# Altium PCB Audio_Meter_V4.5.PcbDoc (part 4 of 5)
Units mil, origin at the board's own origin, x right, y up, seen from the top; angles counter-clockwise.
Board outline 2756.14 x 2519.69 mil, 2 copper layers (Top Layer, Bottom Layer), stack 57.087 mil thick; 109 components, 62 nets, 315 pads, 566 vias.
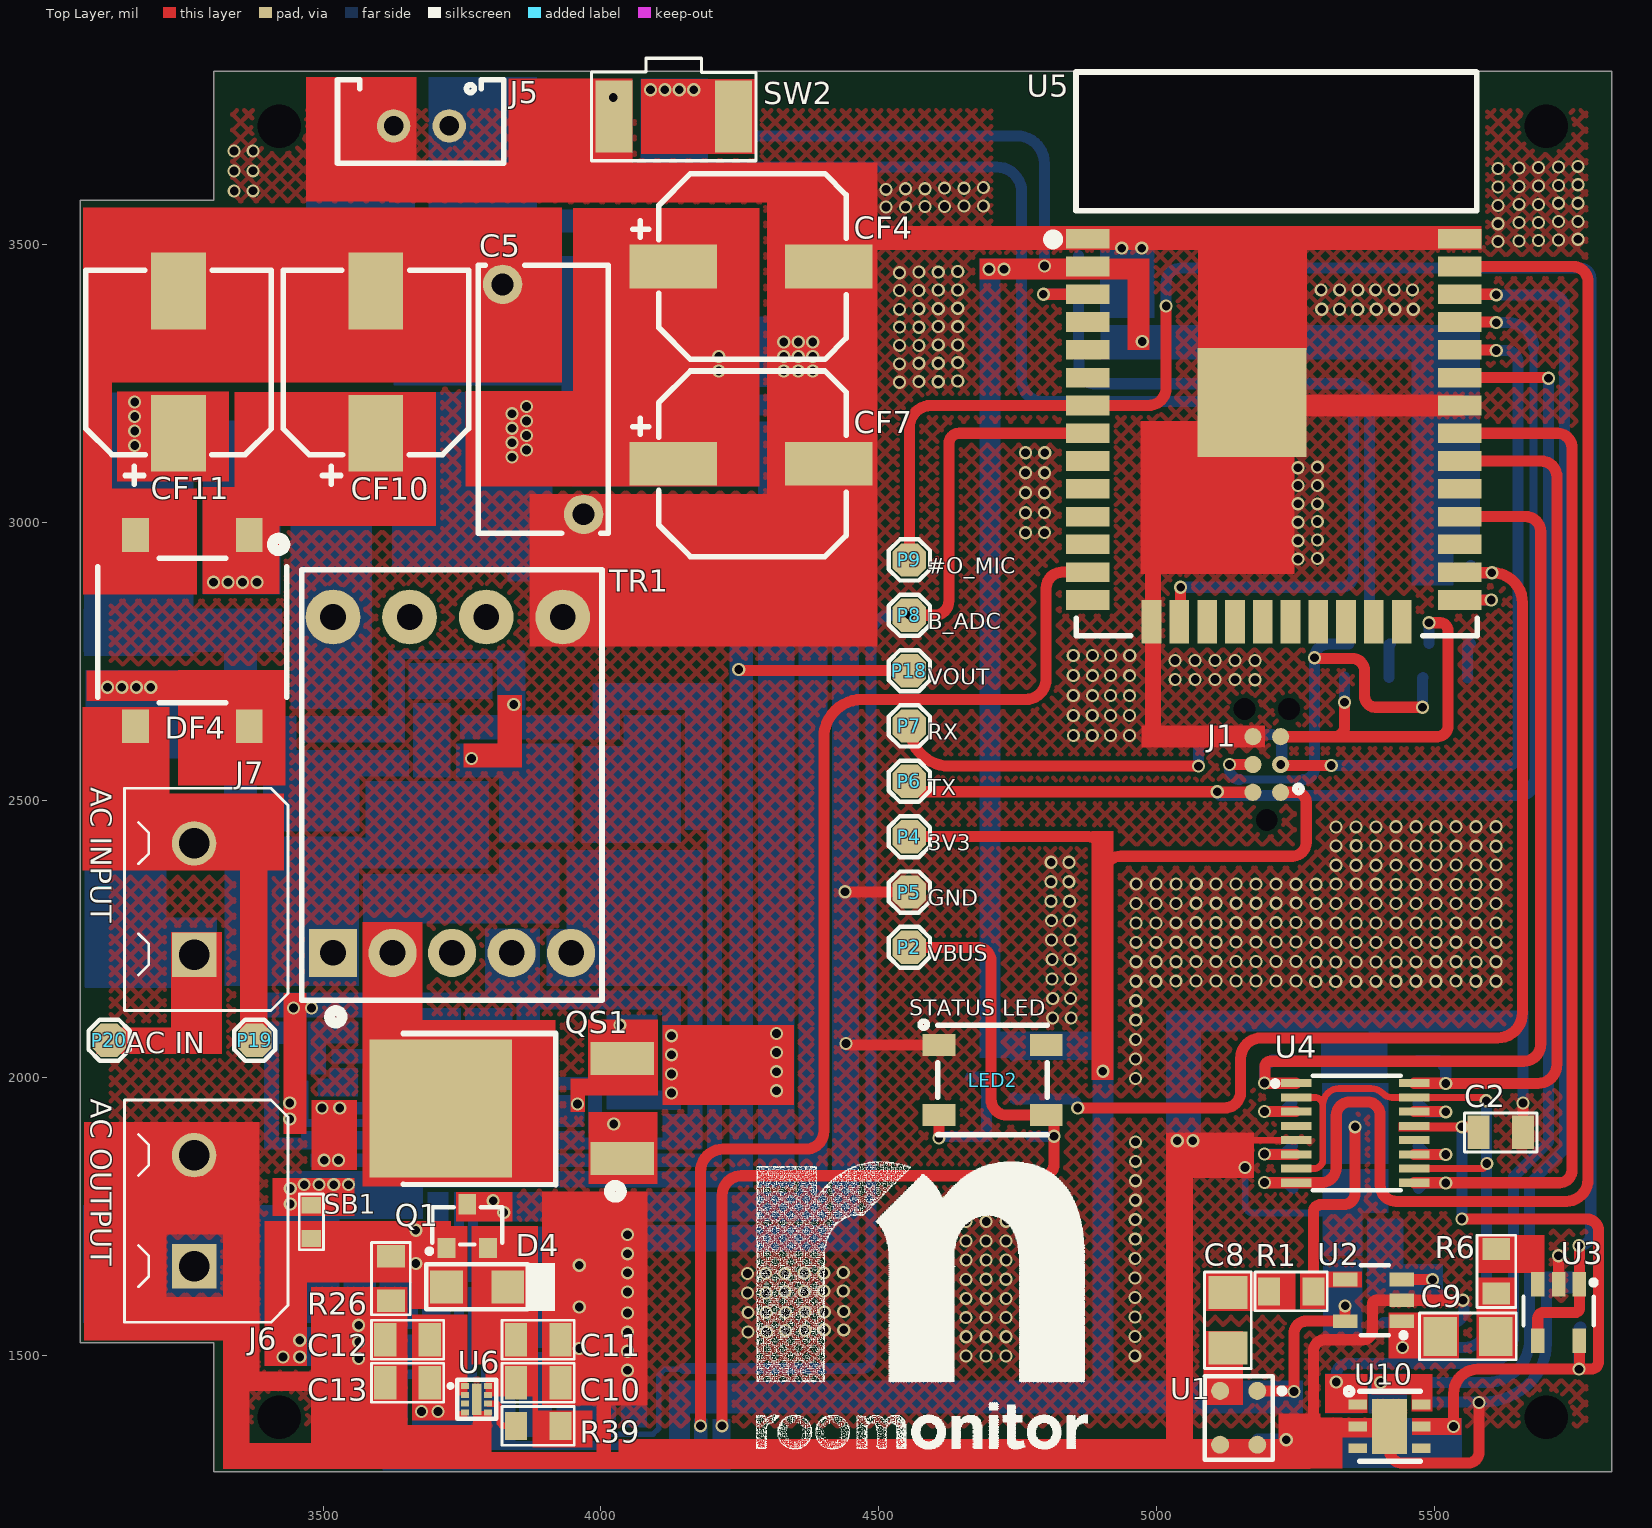
[diagram p0: Top Layer view]

## Part data (continued)
U7: "IC BAT CHG LI-ION 1 CELL SOT23-6", Battery Pack Voltage=4.2V, Case/Package=SOT-23-6, MANUFACTURER="Texas Instruments", Max Charge Current=800mA, Max Operating Temperature=125°C, Max Supply Voltage=6.45V, Min Operating Temperature=0°C, Supplier Part Number 1=296-47315-1-ND, ComponentLink1Description=http://www.ti.com/lit/ds/symlink/bq21040.pdf?src-supplier=Digi-Key, ComponentLink1URL=http://www.ti.com/lit/ds/symlink/bq21040.pdf?src-supplier=Digi-Key, ComponentLink2Description=http://www.ti.com/general/docs/suppproductinfo.tsp?distId=10&gotoUrl=http%3A%2F%2Fwww.ti.com%2Flit%2Fgpn%2Fbq21040&src-supplier=Digi-Key, ComponentLink2URL=http://www.ti.com/general/docs/suppproductinfo.tsp?distId=10&gotoUrl=http%3A%2F%2Fwww.ti.com%2Flit%2Fgpn%2Fbq21040&src-supplier=Digi-Key, ComponentLink3Description=http://www.ti.com/general/docs/suppproductinfo.tsp?distId=10&amp;gotoUrl=http%3A%2F%2Fwww.ti.com%2Flit%2Fgpn%2Fbq21040&src-supplier=Digi-Key, ComponentLink3URL=http://www.ti.com/general/docs/suppproductinfo.tsp?distId=10&amp;gotoUrl=http%3A%2F%2Fwww.ti.com%2Flit%2Fgpn%2Fbq21040&src-supplier=Digi-Key, Differential Output=No, Fault Protection="Over Voltage,Over Temperature,Short Circuit", Interface=USB,SPI, Lead Free="Lead Free", Manufacturer Part Number=BQ21040DBVR, Mount="Surface Mount", Number of Bits=16, Number of Cells=1, Number of D/A Converters=4, Output Type="Analog Current/Voltage", Packaging="Cut Tape", Pricing 1="1=1.14, 10=1.015, 100=0.7396, 500=0.61924, 1000=0.48163 (USD)", Settling Time=30us, Stock 1=5958, Supplier 1=Digi-Key
U10: "SENS HUMID/TEMP 3.6V I2C 2% 6DFN", MANUFACTURER="Silicon Labs", Max Operating Temperature=85°C, Min Operating Temperature=-40°C, Supplier Part Number 1=336-4380-1-ND, Accuracy=3%, ComponentLink1Description=https://www.silabs.com/Support%20Documents/TechnicalDocs/Si7021-A20.pdf?src-supplier=Avnet, ComponentLink1URL=https://www.silabs.com/Support%20Documents/TechnicalDocs/Si7021-A20.pdf?src-supplier=Avnet, ComponentLink2Description=https://www.silabs.com/documents/public/data-sheets/Si7021-A20.pdf?src-supplier=Newark, ComponentLink2URL=https://www.silabs.com/documents/public/data-sheets/Si7021-A20.pdf?src-supplier=Newark, ComponentLink3Description=https://www.silabs.com/Support%20Documents%2fTechnicalDocs%2fSi7021-A20.pdf?src-supplier=Digi-Key, ComponentLink3URL=https://www.silabs.com/Support%20Documents%2fTechnicalDocs%2fSi7021-A20.pdf?src-supplier=Digi-Key, ComponentLink4Description=https://www.silabs.com/Support%20Documents/TechnicalDocs/Si7021-A20.pdf?src-supplier=Avnet+Asia, ComponentLink4URL=https://www.silabs.com/Support%20Documents/TechnicalDocs/Si7021-A20.pdf?src-supplier=Avnet+Asia, ComponentLink5Description=https://www.silabs.com/documents/public/data-sheets/Si7021-A20.pdf?src-supplier=Digi-Key, ComponentLink5URL=https://www.silabs.com/documents/public/data-sheets/Si7021-A20.pdf?src-supplier=Digi-Key, ComponentLink6Description=https://www.silabs.com/documents/public/data-sheets/Si7021-A20.pdf?src-supplier=Farnell, ComponentLink6URL=https://www.silabs.com/documents/public/data-sheets/Si7021-A20.pdf?src-supplier=Farnell, Manufacturer Part Number=SI7021-A20-GM1R, Mount="Surface Mount", Output Type=I2C,Digital, Pricing 1="1=3.37, 25=3.2436, 100=3.2313 (USD)", Response Time=18s, Sensor Type=Temperature, Stock 1=8770, Supplier 1=Digi-Key

## Free pads (board coordinates)
  round 60 hole 78.74 unplated: MH2(3421.11,1389.43) MH3(3421.11,3712.26) MH3(5700.87,1389.43) MH3(5700.87,3712.26)

## Via types
v1: diameter 23.62, hole 15.75, Top Layer to Bottom Layer, 566 vias